# Altium PCB PCL.PcbDoc (part 3 of 3)
Units mil, origin at the board's own origin, x right, y up, seen from the top; angles counter-clockwise.
Board outline 5000 x 5000 mil, 4 copper layers (Top Layer, Layer 1, Layer 2, Bottom Layer), stack 64.009 mil thick; 153 components, 93 nets, 466 pads, 562 vias.
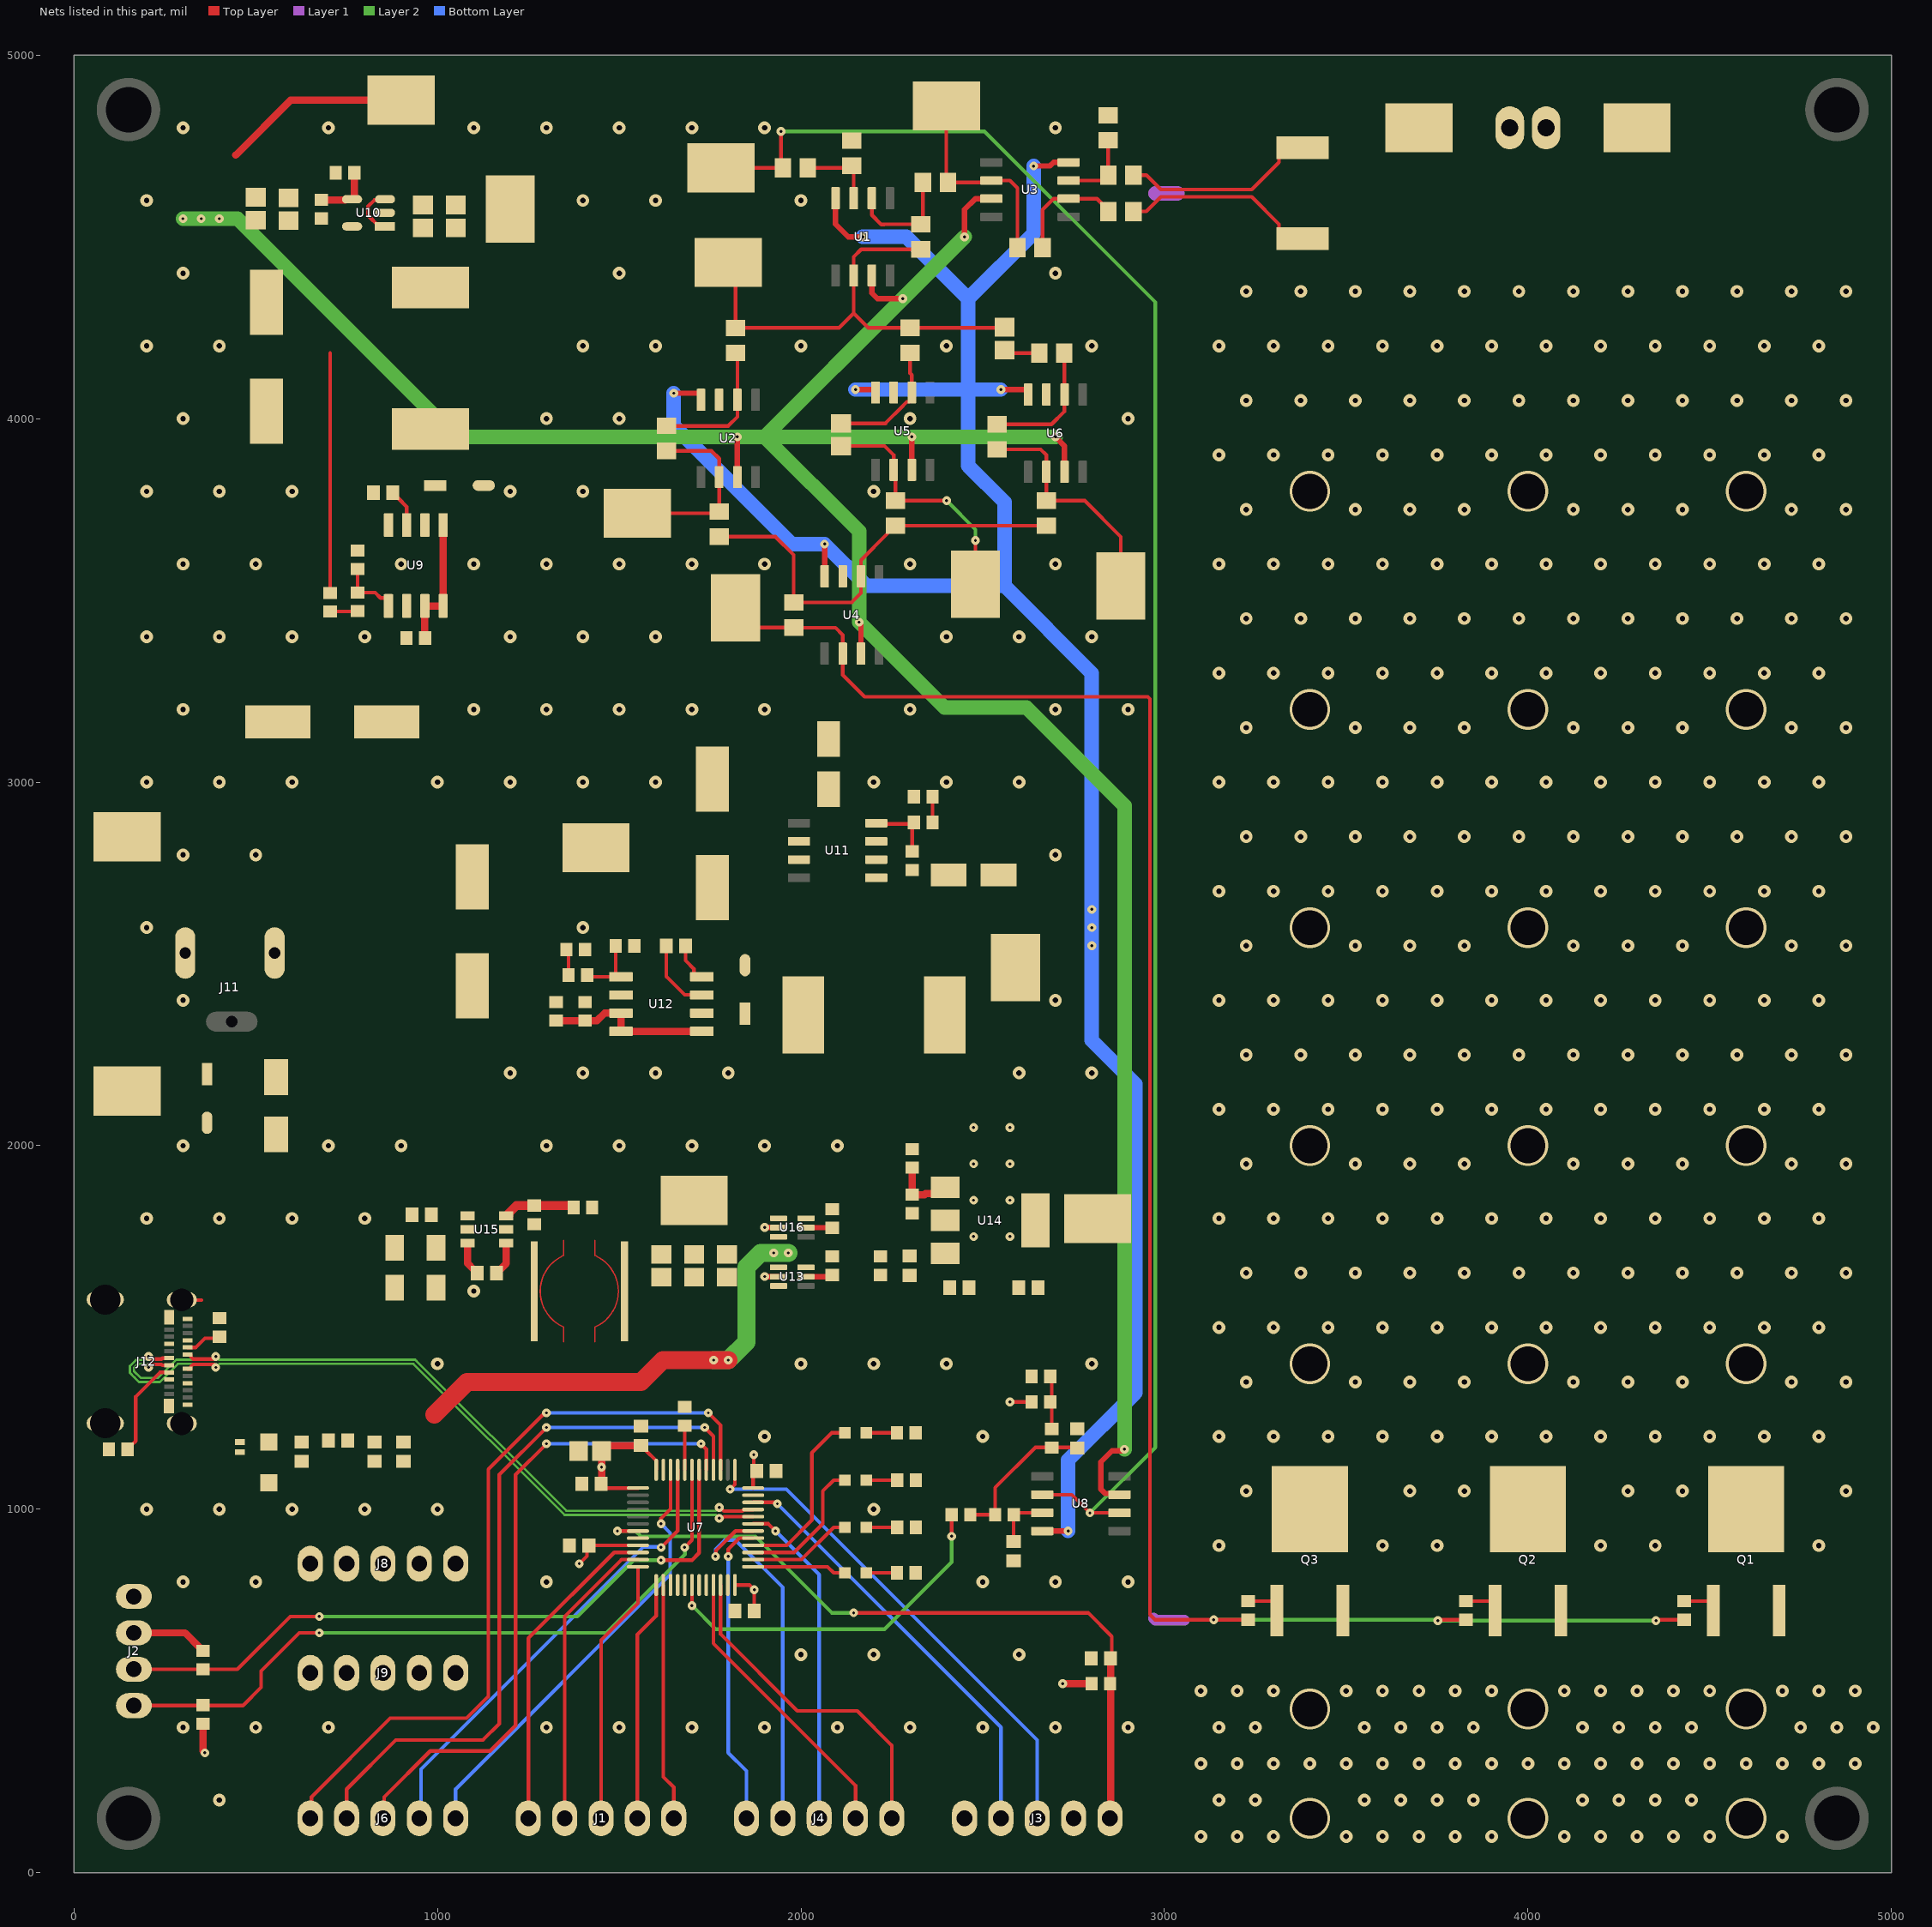
[diagram p4: the nets of this part, all layers, seen from the top]

## Part data (continued)
R55: library part CRGP0603F390R, "RES 390 OHM 1% 1/4W 0603", Device Package="0603 (1608 Metric)", Manufacturer="TE Connectivity Passive Product", Operating Temperature="-55°C ~ 155°C", Power (Watts)="0.25W, 1/4W", Resistance="390 Ohms", Supplier Device Package=0603, Supplier Part Number 1=A130411CT-ND, Temperature Coefficient=±100ppm/°C, Tolerance=±1%, ComponentLink1Description=Datasheet, ComponentLink1URL=https://www.te.com/commerce/DocumentDelivery/DDEController?Action=srchrtrv&DocNm=9-1773463-9&DocType=DS&DocLang=English, ComponentLink2Description="DigiKey Link", ComponentLink2URL=https://www.digikey.com/en/products/detail/te-connectivity-passive-product/CRGP0603F390R/8577013, Composition="Thick Film", Features="Pulse Withstanding", Height - Seated (Max)="0.022\" (0.55mm)", LastUpdated="2024-02-09 8:43:36 PM", Lifecycle Status=Active, Minimum Order=1, Number of Terminations=2, Package / Case="0603 (1608 Metric)", Packaging=TapeAndReel, Part Number=CRGP0603F390R, Part Status=Active, PartId=5035, Price=0.02, Series=CRGP, Size / Dimension="0.063\" L x 0.031\" W (1.60mm x 0.80mm)", Supplier 1=DigiKey
R57: library part RT0603BRD072K8L, "RES SMD 2.8K OHM 0.1% 1/10W 0603", Device Package="0603 (1608 Metric)", Manufacturer=Yageo, Operating Temperature="-55°C ~ 155°C", Power (Watts)="0.1W, 1/10W", Resistance="2.8 kOhms", Supplier Device Package=0603, Supplier Part Number 1=YAG1624CT-ND, Temperature Coefficient=±25ppm/°C, Tolerance=±0.1%, ComponentLink1Description=Datasheet, ComponentLink1URL=https://www.yageo.com/upload/media/product/productsearch/datasheet/rchip/PYu-RT_1-to-0.01_RoHS_L_11.pdf, ComponentLink2Description="DigiKey Link", ComponentLink2URL=https://www.digikey.com/en/products/detail/yageo/RT0603BRD072K8L/1072442, Composition="Thin Film", Height - Seated (Max)="0.022\" (0.55mm)", LastUpdated="2026-04-06 7:44:00 PM", Lifecycle Status=Active, Minimum Order=1, Number of Terminations=2, Package / Case="0603 (1608 Metric)", Packaging=TapeAndReel, Part Number=RT0603BRD072K8L, Part Status=Active, PartId=6307, Price=0.03, Series=RT, Size / Dimension="0.063\" L x 0.031\" W (1.60mm x 0.80mm)", Supplier 1=DigiKey
R58: library part ERJ-3EKF4990V, "RES SMD 499 OHM 1% 1/10W 0603", Device Package="0603 (1608 Metric)", Manufacturer="Panasonic Electronic Components", Operating Temperature="-55°C ~ 155°C", Power (Watts)="0.1W, 1/10W", Ratings=AEC-Q200, Resistance="499 Ohms", Supplier Device Package=0603, Supplier Part Number 1=P499HCT-ND, Temperature Coefficient=±100ppm/°C, Tolerance=±1%, ComponentLink1Description=Datasheet, ComponentLink1URL=https://industrial.panasonic.com/cdbs/www-data/pdf/RDA0000/AOA0000C304.pdf, ComponentLink2Description="DigiKey Link", ComponentLink2URL=https://www.digikey.com/en/products/detail/panasonic-electronic-components/ERJ-3EKF4990V/196380, Composition="Thick Film", Features="Automotive AEC-Q200", Height - Seated (Max)="0.022\" (0.55mm)", LastUpdated="2024-02-09 8:43:34 PM", Lifecycle Status=Active, Minimum Order=1, Number of Terminations=2, Package / Case="0603 (1608 Metric)", Packaging=TapeAndReel, Part Number=ERJ-3EKF4990V, Part Status=Active, PartId=5666, Price=0.01, Series=ERJ-3EK, Size / Dimension="0.063\" L x 0.031\" W (1.60mm x 0.80mm)", Supplier 1=DigiKey
R59 R60: library part RMCF0603FT5R10, "RES 5.1 OHM 1% 1/10W 0603", Device Package="0603 (1608 Metric)", Manufacturer="Stackpole Electronics Inc", Operating Temperature="-55°C ~ 155°C", Power (Watts)="0.1W, 1/10W", Ratings=AEC-Q200, Resistance="5.1 Ohms", Supplier Device Package=0603, Supplier Part Number 1=RMCF0603FT5R10CT-ND, Temperature Coefficient=±200ppm/°C, Tolerance=±1%, ComponentLink1Description=Datasheet, ComponentLink1URL=https://www.seielect.com/catalog/sei-rmcf_rmcp.pdf, ComponentLink2Description="DigiKey Link", ComponentLink2URL=https://www.digikey.com/en/products/detail/stackpole-electronics-inc/RMCF0603FT5R10/1761181, Composition="Thick Film", Features="Automotive AEC-Q200", Height - Seated (Max)="0.022\" (0.55mm)", LastUpdated="2024-02-09 8:43:31 PM", Lifecycle Status=Active, Minimum Order=1, Number of Terminations=2, Package / Case="0603 (1608 Metric)", Packaging=CutTape, Part Number=RMCF0603FT5R10, Part Status=Active, PartId=6203, Price=0.01, Series=RMCF, Size / Dimension="0.061\" L x 0.031\" W (1.55mm x 0.80mm)", Supplier 1=DigiKey
TP1 TP2 TP3 TP4 TP5 TP6 TP7 TP8 TP9 TP10 TP11 TP13 TP14 TP15 TP16 TP17 TP18: library part CMP-2000-05178-1, "Test Point, 1-Pin SMT, RoHS, Tape and Reel", Manufacturer=Keystone, Package Description="1-Pin Test Point, Body 3.81 x 2.04 mm", Standard Package=1, Catalog Drawings="5016Top /  / 5016Side /  / 5016Front", Category=TestandMeasurement, Datasheet URL=https://ciiva.com/datasheet-click-2917613?src=ciiva&sig=4a4e90f, Datasheet Version="Rev. D, 03/2014", Family=TestPoints, Featured Product="SurfaceMountTestPoints /  / 5019MiniatureSurfaceMountTestPoint", Manufacturer URL=http://www.keyelco.com/, Material=PhosphorBronze, Mounting Type=SurfaceMount, Online Catalog=SurfaceMountTestPoints, Other Names=5016KDKR, Package Reference=5016, Packaging=Digi-Reel, RoHS Information=RoHSComplianceStatement, Terminal="0.015\"(0.38mm)PhosphorBronze,SilverPlated", Type=PCTestPoint,Compact
U1 U2 U3 U4 U5 U6 U8: library part CMP-0015-00070-3, "IC OPAMP GP 1 CIRCUIT 8SOIC", Case/Package=D, Dual Supply Voltage=9V, Input Bias Current=7nA, Input Offset Voltage (Vos)=150uV, Max Dual Supply Voltage=18V, Max Operating Temperature=70°C, Min Dual Supply Voltage=3V, Min Operating Temperature=0°C, Nominal Supply Current=5mA, Package Quantity=1, Voltage Gain=112.04dB, Bandwidth=600kHz, Common Mode Rejection Ratio=100dB, Gain Bandwidth Product=600kHz, Height=1.58mm, Lead Free="Lead Free", Length=4.9mm, Max I/O Voltage=150uV, Nominal Gain Bandwidth Product=600kHz, Number of Amplifiers=1, Number of Channels=1, Number of Circuits=1, Number of Elements=1, Number of Pins=8, Operating Supply Voltage=18V, Packaging="Tape and Reel", Radiation Hardening=No, REACH SVHC="No SVHC", Slew Rate=0.3V/µs, Unity Gain Bandwidth Product=600kHz, Width=3.91mm
U7: library part CMP-0237-00215-3, "ARM Cortex-M3 32-bit MCU, 64 KB Flash, 20 KB Internal RAM, 37 I/Os, 48-pin LQFP, -40 to 85 degC, Tray", I/Os (High Current)=37, Operating Frequency(F) (Processor speed) (MHz)=72, Supply Voltage(Vcc) min (V)=2, A/D Converter="2x12-bit (10 Channel)", ComponentLink1Description="Manufacturer URL", ComponentLink1URL=http://www.st.com/web/en/home.html, ComponentLink2Description=Datasheet, ComponentLink2URL=http://www.st.com/st-web-ui/static/active/en/resource/technical/document/datasheet/CD00161566.pdf, ComponentLink3Description="Package Specification", ComponentLink3URL=http://www.st.com/st-web-ui/static/active/en/resource/technical/document/datasheet/DM00058181.pdf, Core="ARM Cortex-M3", DatasheetVersion="Rev. 16", FLASH Size (Prog) (kB)=64, Internal RAM Size (kB)=20, Mounting Technology="Surface Mount", PackageDescription="48-Pin Low Profile Quad Flat Package, 7 x 7 mm Body, 0.5 mm Pitch", PackageReference=LQFP48, PackageVersion="Rev. 6, 06/2013", Packing=Tray, PartNumber=STM32F103C8T6
U9 U12: library part CMP-0323-00192-3, "Inverting Buck-Boost Regulator with 3 to 40 V Input and 1.25 to 40 V Output, -40 to 85 degC, 8-Pin SOIC (D), Green (RoHS & no Sb/Br)", Manufacturer="Texas Instruments", Rating=Catalog, Switch Current Limit(Typ)(A)=1.5, Code_JEDEC=MS-012AA, ComponentLink1Description=Datasheet, ComponentLink1URL=http://www.ti.com/general/docs/lit/getliterature.tsp?genericPartNumber=MC33063A&fileType=pdf, ComponentLink2Description="Package Specification", ComponentLink2URL=http://www.ti.com/litv/pdf/msoi002j, ComponentLink3Description="URL Link1", ComponentLink3URL="Samples URL:http://www.ti.com/product/mc33063a#samples", DatasheetVersion=SLLS636M, Eco-Plan="Green (RoHS & no Sb/Br)", Iout(Max)(A)=0.75, Mounting Technology="Surface Mount", PackageDescription="8-Pin Plastic Small Outline Integrated Circuit, 4.9 x 3.9 mm, Pitch 1.27 mm Pitch", PackageReference=D0008A, PackageVersion="revM, Jun-2011", PartNumber=MC33063ADR, Regulated Outputs(#)=1, SubFamily="Step-Down Regulator", Topology="Inverting Buck-Boost", Vin(Max)(V)=40, Vin(Min)(V)=3, Vout(Max)(V)=40, Vout(Min)(V)=1.25
U10: library part CMP-12756-000046-1, "IC REG LIN POS ADJ 250MA SOT25"
U11: library part CMP-04917-000032-1, "IC REG LIN NEG ADJ 100MA 8SOIC", Dropout Voltage=2200mV, Manufacturer="Texas Instruments", Max Junction Temp=+125°C, Max Supply Voltage=-4.2V, Min Supply Voltage=-40V, Output Current=100mA, Output Voltage=-37-1.2V, Package=D0008A, Temperature="-25°C to +100°C", Temperature Range High=+100°C, Temperature Range Low=-25°C, Accuracy Percentage=1.4%, Automotive=No, Category=IC, ComponentLink2Description=Datasheet, ComponentLink2URL=http://www.ti.com/lit/ds/symlink/lm337l.pdf, Device Class L1="Integrated Circuits (ICs)", Device Class L2="Power Management ICs", Device Class L3="Voltage Regulators - Linear", Digikey Description="IC REG LIN NEG ADJ 100MA 8SOIC", Height=1.75mm, Lead Free=Yes, Manufacturer Part Number=LM337LMX/NOPB, Mouser Description="Regulator, Adjustable Negative; SOT-223; -1.2 to -37 V; 0.01 %/V (Typ.", Number Of Outputs=1, Octopart=https://octopart.com/lm337lmx%2Fnopb-texas+instruments-24813736, Output Type=AdjustableProgrammable, RoHS=TRUE, Standoff Height=0.11mm
U13 U16: "1.5-V to 5.5-V, 1.5-A, 0.5-ÂµA IQ ideal diode with integrated FET", Package="SOT-SC70-6 Texas Instruments", Check_prices=https://www.snapeda.com/parts/LM66100DCKR/Texas+Instruments/view-part/?ref=eda, MF="Texas Instruments", MP=LM66100DCKR, SnapEDA_Link=https://www.snapeda.com/parts/LM66100DCKR/Texas+Instruments/view-part/?ref=snap
U14: "IC REG LIN POS ADJ 1.5A SOT223-4", Current - Output=1.5A, Device Package="TO-261-4, TO-261AA", Manufacturer="Texas Instruments", Operating Temperature="0°C ~ 125°C", Supplier Device Package=SOT-223-4, Supplier Part Number 1=296-12602-2-ND, Voltage - Input (Max)=40V, Voltage - Output (Max)=37V, Voltage - Output (Min/Fixed)=1.25V, ComponentLink1Description=Datasheet, ComponentLink1URL=http://www.ti.com/general/docs/suppproductinfo.tsp?distId=10&gotoUrl=http%3A%2F%2Fwww.ti.com%2Flit%2Fgpn%2Flm317, ComponentLink2Description="DigiKey Link", ComponentLink2URL=//digikey.com/product-detail/en/texas-instruments/LM317DCYR/296-12602-2-ND/443739, LastUpdated="2019-12-09 2:53:08 PM", Lifecycle Status=0, Minimum Order=1, Mounting Type="Surface Mount", Number of Regulators=1, Output Configuration=Positive, Output Type=Adjustable, Package / Case="TO-261-4, TO-261AA", Packaging=TapeAndReel, Part Number=LM317DCYR, Part Status=Active, Price=0.28, Protection Features="Over Temperature, Short Circuit", PSRR="64dB ~ 57dB (120Hz)", Series=-, Supplier 1=DigiKey
U15: "IC REG BUCK ADJ 1A TSOT23-6", Current - Output=1A, Frequency - Switching=500kHz, Manufacturer=3PEAK, Operating Temperature="-40°C ~ 125°C (TA)", Supplier Device Package=TSOT-23-6, Supplier Part Number 1=5503-TPP361060-T6TRCT-ND, Voltage - Input (Max)=36V, Voltage - Input (Min)=4.5V, Voltage - Output (Min/Fixed)=0.6V, ComponentLink1Description=Datasheet, ComponentLink1URL=https://file.3peakic.com.cn:8080/product/Datasheet_TPP36106.pdf, ComponentLink2Description="DigiKey Link", ComponentLink2URL=https://www.digikey.com/en/products/detail/3peak/TPP361060-T6TR/22228294, Function=Step-Down, LastUpdated="2025-07-28 2:05:04 PM", Lifecycle Status=Active, Minimum Order=1, Mounting Type="Surface Mount", Number Of Outputs=1, Output Configuration=Positive, Output Type=Adjustable, Packaging=TapeAndReel, Part Number=TPP361060-T6TR, Price=0.12, Series=-, Supplier 1=DigiKey, Synchronous Rectifier=Yes, Topology=Buck, Voltage - Output (Max)=36V

## Free pads (board coordinates)
  round 175 hole 125 mask+0: 7(150,150) 7(150,4850) 7(4850,150) 7(4850,4850)

## Via types
v1: diameter 35, hole 15, Top Layer to Bottom Layer, tented both sides, 466 vias
v2: diameter 24, hole 8, Top Layer to Bottom Layer, tented both sides, 75 vias
v3: diameter 112, hole 96, Top Layer to Bottom Layer, 21 vias

## Nets (pads, with @x,y where several pads share a name; then routed paths per layer and width w, separated by ;. In a path a pad name is that pad's centre, name@x,y a point inside that pad or via, vN(x,y) a via of type N, cw(c..) or ccw(c..) an arc to the next point about the centre after c; other vN are vias at no path point)
+3V3: C4.2 C5.2 C6.2 C7.2 C8.2 C9.2 C25.2 J2.2 J3.1 J8.1 J8.2 J8.3 J8.4 J8.5 R25.2 R26.2 R27.2 R35.2 R53.2 TP15.1 U7.1 U7.9 U7.24 U7.36 U7.48 U14.2 U14.4 | length 1249.8
  Top Layer w10: v2(1390,850) 1411.17,871.17 1411.17,894.6 C6.2@1416.57,900 1417.36,900.79 U7.9@1551.54,900.79 ; C7.2@1450,1070 1461.73,1058.27 U7.1@1551.54,1058.27 ; C8.2@1560,1175 1561.97,1175 1574.69,1162.28 1574.69,1160.31 1601.02,1133.98 1601.65,1133.98 1601.73,1133.9 U7.48@1601.73,1108.46 ; U7.24@1818.27,791.54 1858.46,791.54 v2(1871.57,778.43) C4.2@1871.57,720 ; U7.36@1868.46,1058.27 1868.46,1095.04 C5.2@1878.43,1105 1870,1113.43 v2(1870,1150) ; v2@2570,1300 v2(2575,1295) R35.2@2634.41,1295
  Top Layer w20: J2.2@164.61,659.92 305.67,659.92 346.3,619.29 346.3,617.32 353.03,610.59 R25.2@355,610.59 ; R26.2@355,410 355,335 v2(360,330) ; C7.2@1450,1070 1451.5,1071.5 C9.2@1451.5,1160 1466.5,1175 C8.2@1560,1175 ; v2(2720,520) R27.2@2799.41,520
  other v2: 1451.5,1115.75 2475,1750 2575,1750 2475,1850 2575,1850 2475,1950 2575,1950 2475,2050 2575,2050
+4V: C27.2 C28.2 C29.2 L3.2 R57.2 TP16.1 U13.3 U16.1
+18.5V: C15.2 C16.2 C18.1 L1.2 R43.2 TP11.1 U10.1 U10.3 | length 798.3
  Top Layer w10: R43.2@705,3520.59 705,4180 ; U10.1@855.68,4528.7 839.31,4528.7 809.14,4558.87 809.14,4584.14 826.08,4601.08 853.25,4601.08 U10.3@855.68,4603.5
+18V: C12.2 C13.2 R40.1 TP10.1 U1.7 U2.7 U3.7 U4.7 U5.7 U6.7 U8.7 U10.5 | length 8180.8
  Top Layer w15: U2.7@1825,3839.25 v2(1825,3950) ; v2(2160,3440) 2160,3437.56 2165,3432.56 U4.7@2165,3353.7 ; U1.7@2195,4393.7 2195,4345 2210,4330 v2(2280,4330) ; U5.7@2305,3859.25 v2(2305,3950) ; v2(2450,4500) 2450,4575 2480,4605 U3.7@2523.7,4605 ; v2(2700,3950) 2725,3925 U6.7@2725,3853.7 ; U8.7@2876.3,1040 2872.97,1043.33 2836.67,1043.33 2825,1055 2825,1130 2855.5,1160.5 2883.06,1160.5 2887.56,1165 v2(2890,1165)
  Top Layer w20: 445,4725 596.1,4876.1 TP10.1@900.38,4876.1
  Layer 2 w40: v2(300,4550) v2(350,4550) v2(400,4550) 450,4550 1050,3950 v2(1825,3950) 1900,3950 ; v2(2450,4500) v2(2280,4330) 1900,3950 ; v2(2700,3950) 1900,3950 ; v2(2890,1165) 2890,2935 2620,3205 2395,3205 v2(2160,3440) 2160,3690 1900,3950
+24V: C17.1 C22.1 C30.2 C31.2 C32.2 D7.2 D9.1 J11.A R38.1 R44.1 R46.1 TP17.1 U9.6 U12.6 U15.4 U15.5
+VUSB: C35.2 C36.2 FB1.2 U13.1 U16.3 | length 1318.3
  Top Layer w50: 991.53,1260 1081.53,1350 1560,1350 1620,1410 v2(1760,1410) v2(1800,1410)
  Layer 2 w50: v2(1760,1410) v2(1800,1410) 1850,1460 1850,1665.71 1889.29,1705 v2(1965,1705)
  other v2: 1925,1705
+VUSB_IN: C34.2 D8.2 D10.2 FB1.1 J12.A4 J12.A9 J12.B4 J12.B9
-18.5V: C19.2 C21.1 C23.2 D6.2 R51.2 TP14.1 U11.2 U11.3 U11.6 U11.7 U12.4 | length 111.8
  Top Layer w10: C21.1@1682.68,2549.62 1682.68,2509.26 1705.39,2486.56 1705.39,2472.41 1713.18,2464.62 U12.4@1727.32,2464.62
-18V: C20.2 R45.1 TP13.1 U1.4 U2.4 U3.4 U4.4 U5.4 U6.4 U8.4 U11.1 | length 6698.1
  Top Layer w15: v2(1650,4070) 1720.69,4070 1725,4065.69 U2.4@1725,4051.85 ; U4.4@2065,3566.3 v2(2065,3655) ; U1.4@2095,4606.3 2095,4535 2130,4500 v2(2170,4500) ; v2(2150,4080) 2200.69,4080 2205,4075.69 U5.4@2205,4071.85 ; v2(2550,4080) 2620.69,4080 2625,4075.69 U6.4@2625,4066.3 ; v2(2640,4695) 2685,4695 2695,4705 U3.4@2736.3,4705 ; U8.4@2663.7,940 v2(2735,940)
  Bottom Layer w40: v2(1650,4070) 1650,3980 1975,3655 v2(2065,3655) 2180,3540 2560,3540 ; v2(2150,4080) 2460,4080 ; v2(2170,4500) 2290,4500 2460,4330 ; v2(2550,4080) 2460,4080 ; v2(2640,4695) 2640,4510 2460,4330 ; v2(2735,940) 2735,1135 2920,1320 2920,2170 2800,2290 v2(2800,2550) v2(2800,2600) v2(2800,2650) 2800,3300 2560,3540 ; 2460,4080 2460,4330 ; 2460,4080 2460,3870 2560,3770 2560,3540
CURRENT: R4.1 R11.2 TP3.1 U3.6 | length 578
  Top Layer w10: TP3.1@2400,4860 2400,4654.45 R4.1@2404.45,4650 2518.7,4650 U3.6@2523.7,4655 2575,4655 2595.55,4634.45 R11.2@2595.55,4470
d_n: J12.A7 J12.B7 U7.32 | length 2145.8
  Top Layer w10.26: v2@210,1413.42 240.49,1413.42 242.7,1415.63 J12.B7@261.61,1415.63 ; J12.A7@312.8,1386.1 320.67,1386.1 321.44,1386.88 321.44,1392.14 327.46,1398.16 384.71,1398.16 v2@385,1397.87 ; v2(1775,975) 1777.63,977.63 1785.98,977.63 1787.88,979.53 U7.32@1868.46,979.53
  Layer 2 w6.27: v2(205,1420) 195.63,1410.63 170.33,1410.63 153.73,1394.03 153.73,1375.33 167.03,1362.03 179.06,1350 235.94,1350 285.94,1400 380,1400 v2(390,1390) 400,1400 934.06,1400 1349.7,984.37 1765.63,984.37 v2(1775,975)
D_OUTPUT: R16.1 R24.2 TP7.1 U6.6 | length 648.2
  Top Layer w10: R24.2@2540,3915.55 2659.45,3915.55 2675,3900 U6.6@2675,3853.7 R16.1@2675,3774.45 2780.55,3774.45 2880,3675 TP7.1@2880,3540
d_p: J12.A6 J12.B6 U7.33 | length 2119.2
  Top Layer w10.26: v2@210,1398.16 240.49,1398.16 242.7,1395.94 J12.B6@261.61,1395.94 ; J12.A6@312.8,1425.47 320.67,1425.47 321.44,1424.7 321.44,1419.43 327.46,1413.42 383.42,1413.42 v2(390,1420) ; v2(1775,1005) 1777.67,1005 1787.88,994.79 1838.88,994.79 1843.3,999.21 U7.33@1868.46,999.21
  Layer 2 w6.27: v2(205,1390) 195.63,1399.37 175,1399.37 165,1389.37 165,1380 183.73,1361.27 231.27,1361.27 281.27,1411.27 381.27,1411.27 v2(390,1420) 398.73,1411.27 938.73,1411.27 942.03,1407.97 1354.37,995.63 1765.63,995.63 v2(1775,1005)
GATE: R14.2 R21.1 R22.1 R23.1 TP5.1 U4.6 | length 5483.9
  Top Layer w10: TP5.1@1820,3480 1874.45,3425.55 R14.2@1980,3425.55 1980.55,3425 2095,3425 2115,3405 U4.6@2115,3353.7 2115,3295 2175.14,3234.86 2954.14,3234.86 2960,3229 2960,710 2974.09,695.91 v2(3135.59,695.91) R23.1@3230,695.91 ; v2@3750,691.5 v2(3752.2,693.7) 3754.41,695.91 R22.1@3829.45,695.91 ; v2@4350,691.5 v2(4352.2,693.7) 4354.41,695.91 R21.1@4430,695.91
  Layer 2 w10: v2(3135.59,695.91) 3750,695.91 v2(3752.2,693.7) v2(4352.2,693.7)
GND: C3.1 C4.1 C5.1 C6.1 C7.1 C8.1 C9.1 C10.1 C11.1 C12.1 C13.1 C14.2 C15.1 C16.1 C17.2 C18.2 C19.1 C20.1 C22.2 C23.1 C24.1 C25.1 C26.1 C27.1 C28.1 C29.1 C30.1 C31.1 C32.1 C34.1 C35.1 C36.1 D5.2 D7.1 D8.1 D9.2 D10.1 J2.1 J3.4 J9.1 J9.2 J9.3 J9.4 J9.5 J11.B J12.A1 J12.A12 J12.B1 J12.B12 J12.S J13.2 L2.2 Q1.3 Q2.3 Q3.3 R2.1 R6.1 R28.1 R29.1 R30.1 R31.1 R32.1 R37.1 R39.1 R41.2 R48.1 R50.1 R54.1 R55.1 R58.1 R59.1 R60.1 TP8.1 TP9.1 U2.3 U4.3 U5.3 U6.3 U7.8 U7.23 U7.35 U7.47 U9.4 U10.2 U13.2 U15.2 U16.2 | length 311
  Top Layer w10: J12.S@86.02,1236.5 J12.S@96.02,1226.5 ; J12.S@296.65,1575.87 297.52,1575 350.59,1575 ; R60.1@386.3,1537.32 398.03,1525.59 R60.1@400,1525.59
  Top Layer w15: v2(1900,1640) 1900.19,1639.81 1938.12,1639.81 U13.2@1938.31,1639.62 ; v2(1900,1775) 1900.19,1774.81 1938.12,1774.81 U16.2@1938.31,1774.62
  Layer 1 w30: 2970,700 2975,695 3055,695
  Layer 1 w40: 2975,4620 3035,4620
  other v1: 3100,100 3200,100 3300,100 3500,100 3600,100 3700,100 3800,100 3900,100 4100,100 4200,100 4300,100 4400,100 4500,100 4700,100 400,200 3150,200 3250,200 3550,200 3650,200 3750,200 3850,200 4150,200 4250,200 4350,200 4450,200 3100,300 3200,300 3300,300 3400,300 3500,300 3600,300 3700,300 3800,300 3900,300 4000,300 4100,300 4200,300 4300,300 4400,300 4500,300 4600,300 4700,300 4800,300 4900,300 300,400 500,400 700,400 1300,400 1500,400 1700,400 1900,400 2100,400 2300,400 2500,400 2700,400 2900,400 3150,400 3250,400 3550,400 3650,400 3750,400 3850,400 4150,400 4250,400 4350,400 4450,400 4750,400 4850,400 4950,400 3100,500 3200,500 3300,500 3500,500 3600,500 3700,500 3800,500 3900,500 4100,500 4200,500 4300,500 4400,500 4500,500 4700,500 4800,500 4900,500 2000,600 2200,600 2600,600 300,800 500,800 1300,800 2500,800 2700,800 2900,800 200,1000 400,1000 600,1000 800,1000 1000,1000 2200,1000 1900,1200 2500,1200 1000,1400 2000,1400 2200,1400 2400,1400 2800,1400 1100,1600 200,1800 400,1800 600,1800 800,1800 300,2000 700,2000 900,2000 1300,2000 1500,2000 1700,2000 1900,2000 2100,2000 1200,2200 1400,2200 1600,2200 1800,2200 2600,2200 2800,2200 300,2400 2700,2400 200,2600 1400,2600 300,2800 500,2800 2700,2800 200,3000 400,3000 600,3000 1000,3000 1200,3000 1400,3000 1600,3000 2200,3000 2400,3000 2600,3000 300,3200 1100,3200 1300,3200 1500,3200 1700,3200 1900,3200 2300,3200 2700,3200 2900,3200 200,3400 400,3400 600,3400 800,3400 1200,3400 1400,3400 1600,3400 2400,3400 2600,3400 2800,3400 300,3600 500,3600 900,3600 1100,3600 1300,3600 1500,3600 1700,3600 1900,3600 2300,3600 2700,3600 200,3800 400,3800 600,3800 1200,3800 1400,3800 2200,3800 300,4000 1300,4000 1500,4000 2300,4000 2900,4000 200,4200 400,4200 1400,4200 1600,4200 2000,4200 2400,4200 2800,4200 300,4400 1500,4400 2700,4400 200,4600 1400,4600 1600,4600 2000,4600 300,4800 700,4800 1100,4800 1300,4800 1500,4800 1700,4800 1900,4800 2700,4800
  other v3: 3400,150 4000,150 4600,150 3400,450 4000,450 4600,450
I2C1_SCL: J2.3 R25.1 U7.42 | length 1915.3
  Top Layer w10: J2.3@164.61,559.92 354.49,559.92 R25.1@355,559.41 449.41,559.41 595,705 v2@673.52,705 ; v2(1615,860) 1700,860 1719.84,879.84 U7.42@1719.84,1108.46
  Layer 2 w10: v2(675,705) 1385,705 1540,860 v2(1615,860)
I2C1_SDA: J2.4 R26.1 U7.43 | length 1955.9
  Top Layer w10: J2.4@164.61,459.92 464.92,459.92 515,510 515,555 620,660 v2@674.65,660 ; v2(1680,895) 1700.16,915.16 U7.43@1700.16,1108.46
  Layer 2 w10: v2(675,660) 1465,660 1680.91,875.91 1680.91,894.09 v2(1680,895)
I_OUTPUT: C1.2 R12.1 TP6.1 U5.6 | length 686.3
  Top Layer w10: C1.2@2110,3924.06 2110.94,3925 2230,3925 2255,3900 U5.6@2255,3859.25 2260,3854.25 R12.1@2260,3774.45 v2(2400.55,3774.45) ; TP6.1@2480,3545 v2(2480,3665)
  Layer 2 w10: v2(2400.55,3774.45) 2480,3695 v2(2480,3665)
LED_BLUE: D2.1 U7.27 | length 387.6
  Top Layer w10: U7.27@1868.46,881.1 1981.1,881.1 2060,960 2060,1050 2090,1080 D2.1@2120.94,1080
LED_GREEN: D3.1 U7.25 | length 259.4
  Top Layer w10: U7.25@1868.46,841.73 2073.27,841.73 2090,825 D3.1@2120.94,825
LED_RED: D4.1 U7.26 | length 289.2
  Top Layer w10: U7.26@1868.46,861.42 2001.42,861.42 2090,950 D4.1@2120.94,950
LED_WHITE: D1.1 U7.28 | length 483.9
  Top Layer w10: U7.28@1868.46,900.79 1960.79,900.79 2030,970 2030,1155 2085,1210 D1.1@2115.94,1210
NetC1_1: C1.1 R13.2 U5.2 | length 352.7
  Top Layer w10: C1.1@2110,3987.05 2232.56,3987.05 2281.81,4036.3 2281.81,4036.81 2291.34,4046.34 2298.19,4046.34 2305,4053.15 U5.2@2305,4071.85 2305,4120 2300,4125 R13.2@2300,4181.1
NetC2_2: C2.2 R17.1 | length 99.1
  Top Layer w10: C2.2@2560,4188.5 2568.5,4180 R17.1@2655.55,4180
NetC10_2: C10.2 R33.2 R34.1 R36.2 | length 415.3
  Top Layer w10: R33.2@2465.59,985 R34.1@2534.41,985 2534.41,1059.41 2645,1170 2758.43,1170 C10.2@2760,1168.43
NetC11_2: C11.2 R34.2 U8.3 | length 153.9
  Top Layer w10: C11.2@2585,911.57 2585,984.41 R34.2@2585.59,985 2590.59,990 U8.3@2663.7,990
NetC14_1: C14.1 U9.3 | length 105.8
  Top Layer w10: C14.1@876.96,3796.1 876.96,3794.13 889.67,3781.42 891.64,3781.42 915.38,3757.68 U9.3@915.38,3707.32
NetC21_2: C21.2 U12.3 | length 203
  Top Layer w10: C21.2@1629.53,2549.62 1629.53,2465.47 1680,2415 1726.94,2415 U12.3@1727.32,2414.62
NetC24_2: C24.2 C26.2 R52.2 R54.2 R56.2 U13.6 U14.3 U16.6
NetC33_1: C33.1 U15.6 | length 94.8
  Top Layer w20: U15.6@1082.95,1732.22 1082.95,1676.19 1099.84,1659.3 1101.81,1659.3 1109.53,1651.59 C33.1@1109.53,1649.62
NetC33_2: C33.2 L3.1 U15.1 | length 94.8
  Top Layer w20: C33.2@1162.68,1649.62 1162.68,1651.59 1170.39,1659.3 1172.36,1659.3 1189.25,1676.19 U15.1@1189.25,1732.22
NetD1_2: D1.2 R29.2 | length 84.9
  Top Layer w10: D1.2@2175,1210 R29.2@2259.88,1210
NetD2_2: D2.2 R30.2 | length 84.9
  Top Layer w10: D2.2@2180,1080 R30.2@2264.88,1080
NetD3_2: D3.2 R31.2 | length 84.4
  Top Layer w10: D3.2@2180,825 R31.2@2264.41,825
NetD4_2: D4.2 R32.2 | length 84.9
  Top Layer w10: D4.2@2180,950 R32.2@2264.88,950
NetD5_1: D5.1 L1.1 U9.2
NetD6_1: D6.1 L2.1 U12.2
NetJ1_1: J1.1 U7.10 | length 894.3
  Top Layer w10: J1.1@1250,150 1250,645 1486.1,881.1 U7.10@1551.54,881.1
NetJ1_2: J1.2 U7.11 | length 821.3
  Top Layer w10: J1.2@1350,150 1350,705 1506.42,861.42 U7.11@1551.54,861.42
NetJ1_3: J1.3 U7.12 | length 733.8
  Top Layer w10: J1.3@1450,150 1450,640 1551.54,741.54 U7.12@1551.54,841.73
NetJ1_4: J1.4 U7.13 | length 663
  Top Layer w10: J1.4@1550,150 1550,655 1601.73,706.73 U7.13@1601.73,791.54
NetJ1_5: J1.5 U7.14 | length 653.4
  Top Layer w10: U7.14@1621.42,791.54 1621.42,263.58 1650,235 J1.5@1650,150
NetJ12_A5: J12.A5 R60.2 | length 99.3
  Top Layer w10: J12.A5@312.8,1445.16 335.16,1445.16 360.15,1470.15 395.74,1470.15 R60.2@400,1474.41
NetJ12_B5: J12.B5 R59.2 | length 274.7
  Top Layer w10: R59.2@147.2,1165 147.2,1166.97 158.94,1178.7 160.91,1178.7 170,1187.8 170,1310 236.26,1376.26 J12.B5@261.61,1376.26
NetQ1_1: Q1.1 R21.2 | length 98.3
  Top Layer w10: R21.2@4430,747.09 4497.5,747.09 4510,734.59 Q1.1@4510,721.5
NetQ2_1: Q2.1 R22.2 | length 106.8
  Top Layer w10: R22.2@3829.45,747.09 3896.95,747.09 3909.45,734.59 Q2.1@3909.45,713
NetQ3_1: Q3.1 R23.2 | length 97.7
  Top Layer w10: R23.2@3230,747.09 3296.95,747.09 3309.45,734.59 Q3.1@3309.45,721.5
NetR1_1: R1.1 TP1.1 U8.2 U8.6 | length 5134.6
  Top Layer w10: TP1.1@1780,4690 R1.1@1950,4690 1945,4695 v2(1945,4790) ; U8.2@2663.7,1040 2745,1040 v2(2795,990) U8.6@2876.3,990
  Layer 2 w10: v2(1945,4790) 2505,4790 2975,4320 2975,1170 v2(2795,990)
NetR1_2: R1.2 R2.2 U1.3 | length 214.7
  Top Layer w10: R1.2@2018.9,4690 2134.45,4690 R2.2@2140,4695.55 2145,4690.55 U1.3@2145,4606.3
NetR3_2: R3.2 R6.2 U3.3 | length 211.2
  Top Layer w10: U3.3@2736.3,4655 2830.55,4655 R3.2@2845.55,4670 2845,4670.55 R6.2@2845,4765.55
NetR4_2: R4.2 R9.1 U1.2 | length 310
  Top Layer w10: U1.2@2195,4606.3 2195,4560 2220.86,4534.14 2229.14,4534.14 2229.45,4534.45 R9.1@2330,4534.45 2335.55,4540 R4.2@2335.55,4650
NetR5_2: R5.2 R12.2 R14.1 R16.2 U4.2 | length 1194.3
  Top Layer w10: R5.2@1775,3675.55 1929.45,3675.55 1980,3625 R14.1@1980,3494.45 2139.45,3494.45 2165,3520 U4.2@2165,3566.3 2165,3610.55 2238.43,3683.98 2238.43,3687.91 2256.06,3705.55 R12.2@2260,3705.55 R16.2@2675,3705.55
NetR7_2: R7.2 R10.1 U2.2 | length 383
  Top Layer w10: R10.1@1630,3980 1800,3980 1825,4005 U2.2@1825,4051.85 1825,4175.55 R7.2@1820,4180.55
NetR8_2: R8.2 R11.1 U3.2 | length 315
  Top Layer w10: R11.1@2664.45,4470 2664.45,4574.45 2695,4605 U3.2@2736.3,4605 2814.49,4605 2845.55,4573.94 R8.2@2845.55,4570
NetR17_2: R17.2 R24.1 U6.2 | length 360.3
  Top Layer w10: R24.1@2540,3984.45 2689.45,3984.45 2724.45,4019.45 U6.2@2724.45,4066.85 ; R17.2@2724.45,4180 U6.2@2724.45,4066.85 ; U6.2@2725,4066.3 U6.2@2724.45,4066.85
NetR28_2: R28.2 U7.44 | length 121.7
  Top Layer w10: R28.2@1680,1230 1680.47,1229.53 U7.44@1680.47,1108.46
NetR35_1: R35.1 R36.1 R37.2 | length 146.2
  Top Layer w10: R37.2@2685.59,1365 2690,1360.59 R36.1@2690,1220.59
NetR38_2: R38.2 U9.1 U9.7 U9.8 | length 361.5
  Top Layer w20: R38.2@965.97,3396.1 965.38,3396.69 U9.7@965.38,3484.88 U9.8@1015.38,3484.88 U9.1@1015.38,3707.32
NetR39_2: R39.2 R42.1 U9.5 | length 172.9
  Top Layer w10: R39.2@780.38,3586.1 R42.1@780.38,3521.69 828.57,3521.69 843.44,3506.82 857.59,3506.82 865.38,3499.02 U9.5@865.38,3484.88
NetR40_2: R40.2 R41.1 U10.4 | length 163.8
  Top Layer w20: R40.2@680.38,4601.69 746.19,4601.69 748,4603.5 U10.4@765.08,4603.5 770.33,4603.5 771.56,4604.74 R41.1@771.56,4676.1
NetR42_2: R42.2 R43.1 | length 75.8
  Top Layer w10: R43.1@705,3469.41 779.28,3469.41 R42.2@780.38,3470.51
NetR44_2: R44.2 R46.2 U12.1 U12.7 U12.8 | length 459.7
  Top Layer w20: R46.2@1326.1,2344.03 1439.03,2344.03 1459.62,2364.62 U12.7@1504.88,2364.62 U12.8@1504.88,2314.62 U12.1@1727.32,2314.62
NetR45_2: R45.2 R47.2 U11.4 | length 181.7
  Top Layer w10: U11.4@2207.07,2887.14 2209,2885.21 R47.2@2306.1,2885.21 ; R45.2@2306.1,2809.62 R47.2@2306.1,2885.21 ; R47.2@2310.51,2889.62 R47.2@2306.1,2885.21
NetR47_1: R47.1 R50.2 | length 70
  Top Layer w10: R47.1@2361.69,2889.62 R50.2@2361.69,2959.62
NetR48_2: R48.2 R49.1 | length 72.3
  Top Layer w10: R48.2@1354.92,2539.62 1360.51,2534.03 R49.1@1360.51,2469.62
NetR49_2: R49.2 R51.1 U12.5 | length 183.5
  Top Layer w10: R49.2@1411.69,2469.62 1416.69,2464.62 U12.5@1498.31,2464.62 ; R51.1@1490.51,2549.62 1490.51,2472.41 U12.5@1498.31,2464.62 ; U12.5@1504.88,2464.62 U12.5@1498.31,2464.62
NetR52_1: R52.1 U13.5 | length 74
  Top Layer w15: U13.5@2013.9,1639.62 2081.69,1639.62 R52.1@2086.1,1644.03
NetR53_1: R53.1 R55.2 U14.1 | length 173.8
  Top Layer w20: R55.2@2306.1,1939.62 R53.1@2306.1,1865.21 2306.31,1865 2340,1865 2342.97,1867.97 2379.88,1867.97 U14.1@2397.09,1885.17
NetR56_1: R56.1 U16.5 | length 72.4
  Top Layer w15: U16.5@2013.9,1774.62 2085.51,1774.62 R56.1@2086.1,1774.03
NetR57_1: R57.1 R58.2 U15.3 | length 203.4
  Top Layer w25: U15.3@1189.25,1807.02 1195.75,1807.02 1196.44,1807.71 1196.44,1814.21 1217.44,1835.21 R58.2@1266.1,1835.21 1370.18,1835.21 1374.41,1830.98 R57.1@1374.41,1830
NRST: C3.2 J3.5 R27.1 U7.7 | length 2038.8
  Top Layer w10: v2(1495,940) 1495.16,940.16 U7.7@1551.54,940.16 ; v2(2145,715) 2790,715 2855,650 2855,593.43 C3.2@2851.57,590
  Top Layer w20: J3.5@2850,150 2851.57,151.57 C3.2@2851.57,590
  Layer 2 w10: v2(1495,940) 1545,940 1560,925 1875,925 2085,715 v2(2145,715)
P_OUTPUT: R5.1 R10.2 TP4.1 U2.6 | length 526.1
  Top Layer w10: TP4.1@1550,3740 1770.55,3740 R5.1@1775,3744.45 U2.6@1775,3839.25 1775,3890 1753.9,3911.1 R10.2@1630,3911.1
PA5: U7.15
PA6: U7.16
PA7: U7.17
PA8: J4.1 U7.29 | length 841.8
  Top Layer w10: v2(1800,870) 1800,890 1830.47,920.47 U7.29@1868.46,920.47
  Bottom Layer w10: v2(1800,870) 1800,330 1850,280 J4.1@1850,150
PA9: J4.2 U7.30 | length 1045.5
  Top Layer w10: v2(1765,870) 1766.59,871.59 1766.59,886.59 1820.16,940.16 U7.30@1868.46,940.16
  Bottom Layer w10: v2(1765,870) 1765,890 1790,915 1820,915 1950,785 J4.2@1950,150
PA10: J4.3 U7.31 | length 909.5
  Top Layer w10: U7.31@1868.46,959.84 1910.16,959.84 v2(1930,940)
  Bottom Layer w10: v2(1930,940) 2050,820 J4.3@2050,150
PB0: R33.1 U7.18 | length 1005.7
  Top Layer w10: v2(1700,735) 1700.16,735.16 U7.18@1700.16,791.54 ; R33.1@2414.41,985 v2(2414.41,925.59) v2@2415,925
  Layer 2 w10: v2(1700,735) 1765,670 2230,670 2414.41,854.41 v2(2414.41,925.59)
PB1: U7.19
PB2: U7.20
PB3: J6.1 U7.39 | length 2125.8
  Top Layer w10: J6.1@650,150 653.35,153.35 653.35,208.35 870,425 1080,425 1140,485 1140,1110 1288.41,1258.41 1289.62,1258.41 1296.21,1265 v2(1300,1265) ; v2(1745,1265) 1778.9,1231.1 U7.39@1778.9,1108.46
  Bottom Layer w10: v2(1300,1265) v2(1745,1265)
PB4: J6.2 U7.40 | length 2005
  Top Layer w10: J6.2@750,150 750,230 885,365 1125,365 1170,410 1170,1095 v2(1300,1225) ; v2(1735,1225) 1759.21,1200.79 U7.40@1759.21,1108.46
  Bottom Layer w10: v2(1300,1225) v2(1735,1225)
PB5: J6.3 U7.41 | length 1825.6
  Top Layer w10: J6.3@850,160 J6.3@850,150 853.35,153.35 853.35,208.35 980,335 1145,335 1215,405 1215,1095 v2(1300,1180) ; v2(1725,1180) 1739.53,1165.47 U7.41@1739.53,1108.46
  Bottom Layer w10: v2(1300,1180) v2(1725,1180)
PB8: J6.4 U7.45 | length 1283.5
  Top Layer w10: v2(1615,895) 1660.79,940.79 U7.45@1660.79,1108.46
  Bottom Layer w10: J6.4@950,150 955,155 955,285 1566.59,896.59 1613.41,896.59 v2(1615,895)
PB9: J6.5 U7.46 | length 1224
  Top Layer w10: v2(1615,960) 1615,975 1641.1,1001.1 U7.46@1641.1,1108.46
  Bottom Layer w10: J6.5@1050,150 1050,230 1640,820 1640,935 v2(1615,960)
PB10: J4.4 U7.21 | length 803.4
  Top Layer w10: U7.21@1759.21,791.54 1759.21,630.79 2150,240 J4.4@2150,150
PB11: J4.5 U7.22 | length 933.3
  Top Layer w10: U7.22@1778.9,791.54 1778.9,656.1 1990,445 2155,445 2250,350 J4.5@2250,150
SWCLK: J3.3 U7.37 | length 1404.8
  Top Layer w10: v2(1805,1055) 1818.27,1068.27 U7.37@1818.27,1108.46
  Bottom Layer w10: v2(1805,1055) 1960,1055 2650,365 J3.3@2650,150
SWDIO: J3.2 U7.34 | length 1187.9
  Top Layer w10: U7.34@1868.46,1018.9 1931.1,1018.9 v2(1935,1015)
  Bottom Layer w10: v2(1935,1015) 2550,400 J3.2@2550,150
V_ERROR: C2.1 R7.1 R9.2 R13.1 TP2.1 U1.6 | length 1315.3
  Top Layer w10: TP2.1@1800,4430 1820,4410 R7.1@1820,4249.45 1820.55,4250 2105,4250 2145,4290 ; R7.1@1841.57,4237.64 R7.1@1841.57,4241.57 ; R9.2@2330,4465.55 2165.55,4465.55 2145,4445 U1.6@2145,4393.7 2145,4290 ; C2.1@2560,4251.5 2558.5,4250 R13.1@2300,4250 2185,4250 2145,4290
VIN: J13.1 R3.1 R15.2 TP18.1 | length 537.5
  Top Layer w10: R3.1@2914.45,4670 2950,4670 2990,4630 3240,4630 3315.22,4705.22 3315.22,4718.5 3341.72,4745 R15.2@3380,4745
VIN_SENSE: Q1.2 Q2.2 Q3.2 R8.1 R15.1 | length 537.5
  Top Layer w10: R8.1@2914.45,4570 2950,4570 2990,4610 3240,4610 3315.22,4534.78 3315.22,4521.5 3341.72,4495 R15.1@3380,4495
  other v1: 3150,900 3600,900 3750,900 4200,900 4350,900 4800,900 3225,1050 3675,1050 3825,1050 4275,1050 4425,1050 4875,1050 3150,1200 3300,1200 3450,1200 3600,1200 3750,1200 3900,1200 4050,1200 4200,1200 4350,1200 4500,1200 4650,1200 4800,1200 3225,1350 3525,1350 3675,1350 3825,1350 4125,1350 4275,1350 4425,1350 4725,1350 4875,1350 3150,1500 3300,1500 3450,1500 3600,1500 3750,1500 3900,1500 4050,1500 4200,1500 4350,1500 4500,1500 4650,1500 4800,1500 3225,1650 3375,1650 3525,1650 3675,1650 3825,1650 3975,1650 4125,1650 4275,1650 4425,1650 4575,1650 4725,1650 4875,1650 3150,1800 3300,1800 3450,1800 3600,1800 3750,1800 3900,1800 4050,1800 4200,1800 4350,1800 4500,1800 4650,1800 4800,1800 3225,1950 3525,1950 3675,1950 3825,1950 4125,1950 4275,1950 4425,1950 4725,1950 4875,1950 3150,2100 3300,2100 3450,2100 3600,2100 3750,2100 3900,2100 4050,2100 4200,2100 4350,2100 4500,2100 4650,2100 4800,2100 3225,2250 3375,2250 3525,2250 3675,2250 3825,2250 3975,2250 4125,2250 4275,2250 4425,2250 4575,2250 4725,2250 4875,2250 3150,2400 3300,2400 3450,2400 3600,2400 3750,2400 3900,2400 4050,2400 4200,2400 4350,2400 4500,2400 4650,2400 4800,2400 3225,2550 3525,2550 3675,2550 3825,2550 4125,2550 4275,2550 4425,2550 4725,2550 4875,2550 3150,2700 3300,2700 3450,2700 3600,2700 3750,2700 3900,2700 4050,2700 4200,2700 4350,2700 4500,2700 4650,2700 4800,2700 3225,2850 3375,2850 3525,2850 3675,2850 3825,2850 3975,2850 4125,2850 4275,2850 4425,2850 4575,2850 4725,2850 4875,2850 3150,3000 3300,3000 3450,3000 3600,3000 3750,3000 3900,3000 4050,3000 4200,3000 4350,3000 4500,3000 4650,3000 4800,3000 3225,3150 3525,3150 3675,3150 3825,3150 4125,3150 4275,3150 4425,3150 4725,3150 4875,3150 3150,3300 3300,3300 3450,3300 3600,3300 3750,3300 3900,3300 4050,3300 4200,3300 4350,3300 4500,3300 4650,3300 4800,3300 3225,3450 3375,3450 3525,3450 3675,3450 3825,3450 3975,3450 4125,3450 4275,3450 4425,3450 4575,3450 4725,3450 4875,3450 3150,3600 3300,3600 3450,3600 3600,3600 3750,3600 3900,3600 4050,3600 4200,3600 4350,3600 4500,3600 4650,3600 4800,3600 3225,3750 3525,3750 3675,3750 3825,3750 4125,3750 4275,3750 4425,3750 4725,3750 4875,3750 3150,3900 3300,3900 3450,3900 3600,3900 3750,3900 3900,3900 4050,3900 4200,3900 4350,3900 4500,3900 4650,3900 4800,3900 3225,4050 3375,4050 3525,4050 3675,4050 3825,4050 3975,4050 4125,4050 4275,4050 4425,4050 4575,4050 4725,4050 4875,4050 3150,4200 3300,4200 3450,4200 3600,4200 3750,4200 3900,4200 4050,4200 4200,4200 4350,4200 4500,4200 4650,4200 4800,4200 3225,4350 3375,4350 3525,4350 3675,4350 3825,4350 3975,4350 4125,4350 4275,4350 4425,4350 4575,4350 4725,4350 4875,4350
  other v3: 3400,1400 4000,1400 4600,1400 3400,2000 4000,2000 4600,2000 3400,2600 4000,2600 4600,2600 3400,3200 4000,3200 4600,3200 3400,3800 4000,3800 4600,3800
pads on no net: J11.C J12.A2 J12.A3 J12.A8 J12.A10 J12.A11 J12.B2 J12.B3 J12.B8 J12.B10 J12.B11 U1.1 U1.5 U1.8 U2.1 U2.5 U2.8 U3.1 U3.5 U3.8 U4.1 U4.5 U4.8 U5.1 U5.5 U5.8 U6.1 U6.5 U6.8 U7.2 U7.3 U7.4 U7.5 U7.6 U7.38 U8.1 U8.5 U8.8 U11.5 U11.8 U13.4 U16.4

## Polygon pours and split planes (outlines as drawn)
+24V on Top Layer "NONET_L01_P-001" (solid, pour order 8): 955,2110 955,1540 1055,1540 1055,1750 1110,1750 1110,2200 1280,2370 1435,2370 1460,2395 1545,2395 1545,2435 1185,2435 1185,2615 940,2615 940,3525 885,3525 885,3365 715,3195 715,2615 350,2615 350,2315 40,2315 40,2065 300,2065 300,2110
GND on Top Layer "GND_L01_P026" (solid, pour order 26): 10,4990 2990,4990 2990,10 10,10
+3V3 on Top Layer "NONET_L01_P-001" (solid, pour order 24): 2275,1840 2450,1840 2450,2070 2920,2070 2920,1580 2625,1580 2625,1705 2450,1705 2450,1755 2275,1755
NetC24_2 on Top Layer "NONET_L01_P-001" (solid, pour order 23): 2435,1735 2285,1735 2175,1845 1990,1845 1990,1790 2050,1790 2050,1800 2115,1800 2115,1720 1990,1720 1990,1655 2050,1655 2050,1670 2325,1670 2325,1585 2435,1585
+VUSB_IN on Top Layer "NONET_L01_P-001" (solid, pour order 22): 284.02,1445 294.02,1455 330,1455 330,1475 290,1475 280,1465 230,1465 230,1610 470,1610 470,1330 720,1330 720,1665 155,1665 155,1445
+VUSB_IN on Top Layer "NONET_L01_P-001" (solid, pour order 21): 720,1355 290,1355 280,1365 245,1365 245,1350 275,1350 285,1340 350,1340 350,1175 490,1175 505,1160 720,1160
GND on Top Layer "NONET_L01_P-001" (solid, pour order 20): 340,1598 245,1598 245,1518 340,1518
GND on Top Layer "NONET_L01_P-001" (solid, pour order 19): 340,1295 245,1295 245,1215 340,1215
+4V on Top Layer "NONET_L01_P-001" (solid, pour order 18): 1400,1930 1970,1930 1970,1790 1885,1790 1885,1625 1970,1625 1970,1595 1835,1595 1835,1675 1585,1675 1540,1630 1540,1455 1400,1455 1400,1900
+VUSB on Top Layer "NONET_L01_P-001" (solid, pour order 17): 725,1160 1015,1160 1015,1290 725,1290
+VUSB on Top Layer "NONET_L01_P-001" (solid, pour order 16): 1910,1760 1980,1760 1980,1655 1910,1655
NetC33_2 on Top Layer "NONET_L01_P-001" (solid, pour order 15): 1145,1745 1385,1745 1385,1450 1145,1450
+18V on Top Layer "NONET_L01_P-001" (solid, pour order 14): 795,4575 460,4575 460,4745 245,4745 245,4510 795,4510
+18.5V on Top Layer "NONET_L01_P-001" (solid, pour order 13): 460,4495 825,4495 825,4550 905,4550 910,4555 1090,4555 1115,4580 1115,4685 1285,4685 1285,4155 460,4155
NetD5_1 on Top Layer "NONET_L01_P-001" (solid, pour order 12): 945,3750 905,3790 905,3830 875,3860 875,4030 1090,4030 1090,3855 985,3750 985,3675 945,3675
-18V on Top Layer "NONET_L01_P-001" (solid, pour order 11): 2875,2505 2875,2695 2460,2695 2460,2785 2285,2785 2250,2750 2175,2750 2175,2505
NetD6_1 on Top Layer "NONET_L01_P-001" (solid, pour order 10): 1690,2390 1825,2390 1905,2470 2070,2470 2070,2246.51 2071.06,2245.45 2070.62,2245 1920,2245 1825,2340 1690,2340
-18.5V on Top Layer "NONET_L01_P-001" (solid, pour order 9): 1660,2450 1870,2450 1870,2545 2160,2545 2160,2765 2240,2765 2240,2850 2160,2850 2160,3040 1860,3040 1860,2910 1560,2910 1290,2910 1290,2720 1520,2720 1520,2520 1600,2520 1600,2580 1660,2580 1660,2530
GND on Top Layer "NONET_L01_P-001" (solid, pour order 6): 4990,10 4990,4990 3010,4990 3010,10
VIN on Top Layer "NONET_L01_P-001" (solid, pour order 3): 4000,4990 4000,4720 3300,4720 3300,4990
VIN_SENSE on Top Layer "VIN_SENSE_L01_P000" (solid, pour order 0): 3100,4520 4950,4520 4950,850 3100,850
GND on Layer 1 "NONET_L01_P-001" (solid, pour order 7): 10,4990 2990,4990 2990,10 10,10
GND on Layer 1 "NONET_L01_P-001" (solid, pour order 5): 4990,10 4990,4990 3010,4990 3010,10
VIN_SENSE on Layer 1 "VIN_SENSE_L02_P001" (solid, pour order 1): 3100,4520 4950,4520 4950,850 3100,850
GND on Layer 2 "GND_L03_P027" (solid, pour order 27): 10,4990 2990,4990 2990,10 10,10
GND on Layer 2 "NONET_L01_P-001" (solid, pour order 2): 4990,10 4990,4990 3010,4990 3010,10
GND on Bottom Layer "NONET_L01_P-001" (solid, pour order 28): 10,4990 2990,4990 2990,10 10,10
+3V3 on Bottom Layer "+3V3_L04_P025" (solid, pour order 25): 2990,10 2990,2070 1160,2070 1160,1940 10,1940 10,10
GND on Bottom Layer "NONET_L01_P-001" (solid, pour order 4): 4990,10 4990,4990 3010,4990 3010,10

## Other copper
Top Layer:
  pour cut-out: 1330,4965 1855,4965 1855,4915 1330,4915
  region net V_ERROR: 2145,4290 2100,4245 2190,4245
  text "MCCULLAGH 1" at 1340,4920.8 h60
Layer 1:
  pour cut-out: 1330,4965 1855,4965 1855,4915 1330,4915
  text "MCCULLAGH   2" at 1340,4920.8 h60
Layer 2:
  pour cut-out: 1330,4965 1855,4965 1855,4915 1330,4915
  region net +18V: 1910,3950 1990,4030 1990,3870
  text "MCCULLAGH     3" at 1340,4920.8 h60
Bottom Layer:
  pour cut-out: 1330,4965 1855,4965 1855,4915 1330,4915
  region net -18V: 2460,4340 2495,4375 2425,4375
  region net -18V: 2460,4125 2415,4080 2460,4035 2505,4080
  region net -18V: 2510,3540 2560,3590 2560,3540
  text "MCCULLAGH" at 1677.83,4920.8 h60
  text "4" at 1790,4920.71 h60

## Silkscreen, mask and mechanical layers (free items; w line width, h text height)
Top Overlay:
  lines w5: 165,845 165,970 230,1035 ; 165,875 235,875 ; 165,925 240,925 ; 175,980 230,980 ; 1326.1,2469.62 1306.1,2469.62 1286.1,2489.62 1286.1,2589.62 1286.1,2599.62 1336.1,2649.62
  lines w20: 3000,0 3000,5000
  text "-" at 4135.34,4926.31 h80
  text "+" at 3837.09,4922.6 h80
  text "Current" at 2524.68,4890.77 h60
  text "+18V" at 1027.67,4861.05 h60
  text "Current" at 1464.68,4710.77 h60
  text "Control" at 1467.73,4660.77 h60
  text "+18.5V" at 1305.28,4501.05 h60
  text "V_ERROR" at 1670.44,4295.74 h60
  text "Programmable / Current Load" at -20.25,3719 h100
  text "P_Out" at 1273.24,3715.74 h60
  text "Version 1" at 31.84,3643.84 h80
  text "Designed by / Hunter McCullagh" at 59.5,3521.07 h60
  text "I_Out" at 2423.54,3375.74 h60
  text "D_Out" at 2801.77,3375.74 h60
  text "Gate" at 1762.7,3320.8 h60
  text "GND" at 93,2960.8 h60
  text "-18.5V" at 1362.41,2931.05 h60
  text "-18V" at 2534.81,2331.05 h60
  text "+24V" at 87.67,2250.69 h60
  text "+4V" at 1662.6,1950.71 h60
  text "+3V3" at 2748.84,1661.05 h60
  text "GND" at 243,1010.8 h60
  text "+3V3" at 238.84,961.05 h60
  text "SCL" at 248.08,910.8 h60
  text "SDA" at 244.42,860.8 h60
  text "+3V3" at 1118.84,831.05 h60
  text "GND" at 1123,530.8 h60
  text "PA8" at 1868.95,305.97 h60 r90
  text "PA9" at 1968.95,306.02 h60 r90
  text "PA4" at 1669.29,305.38 h60 r90
  text "PA2" at 1469.31,301.13 h60 r90
  text "PA3" at 1563.95,300.94 h60 r90
  text "PA1" at 1364.31,299.16 h60 r90
  text "PB11" at 2274.31,299.23 h60 r90
  text "NRST" at 2869.2,299.49 h60 r90
  text "GND" at 2764.2,298 h60 r90
  text "PB3" at 668.95,295.94 h60 r90
  text "PB5" at 868.84,295.58 h60 r90
  text "PB8" at 968.95,295.97 h60 r90
  text "PB9" at 1068.95,296.02 h60 r90
  text "PA0" at 1268.95,296.1 h60 r90
  text "PB10" at 2168.95,296.18 h60 r90
  text "PB4" at 769.29,295.38 h60 r90
  text "+3V3" at 2463.95,293.84 h60 r90
  text "PA10" at 2068.95,291.18 h60 r90
  text "SWCLK" at 2664.2,287.63 h60 r90
  text "SWDIO" at 2569.2,286.09 h60 r90
Top Solder:
  rectangle: 3100,900 4950,4520
  rectangle: 3250,10 4750,600
Board Outline:
  the board outline again, w5

## Text inside footprints (layer, text, board x,y; h text height)
Q1: Mechanical 13 "*" at 4497.5,799.5 h50
Q2: Mechanical 13 "*" at 3896.95,799.5 h50
Q3: Mechanical 13 "*" at 3296.95,799.5 h50